# Altium PCB PCB_PowerBoard_7500-0430.PcbDoc (part 2 of 5)
Units mil, origin at the board's own origin, x right, y up, seen from the top; angles counter-clockwise.
Board outline 4000 x 3250 mil, 4 copper layers (Top Layer, Layer 1, Layer 2, Bottom Layer), stack 62.449 mil thick; 205 components, 100 nets, 1585 pads, 235 vias.
Unrouted connection lines stored in the file: 2.
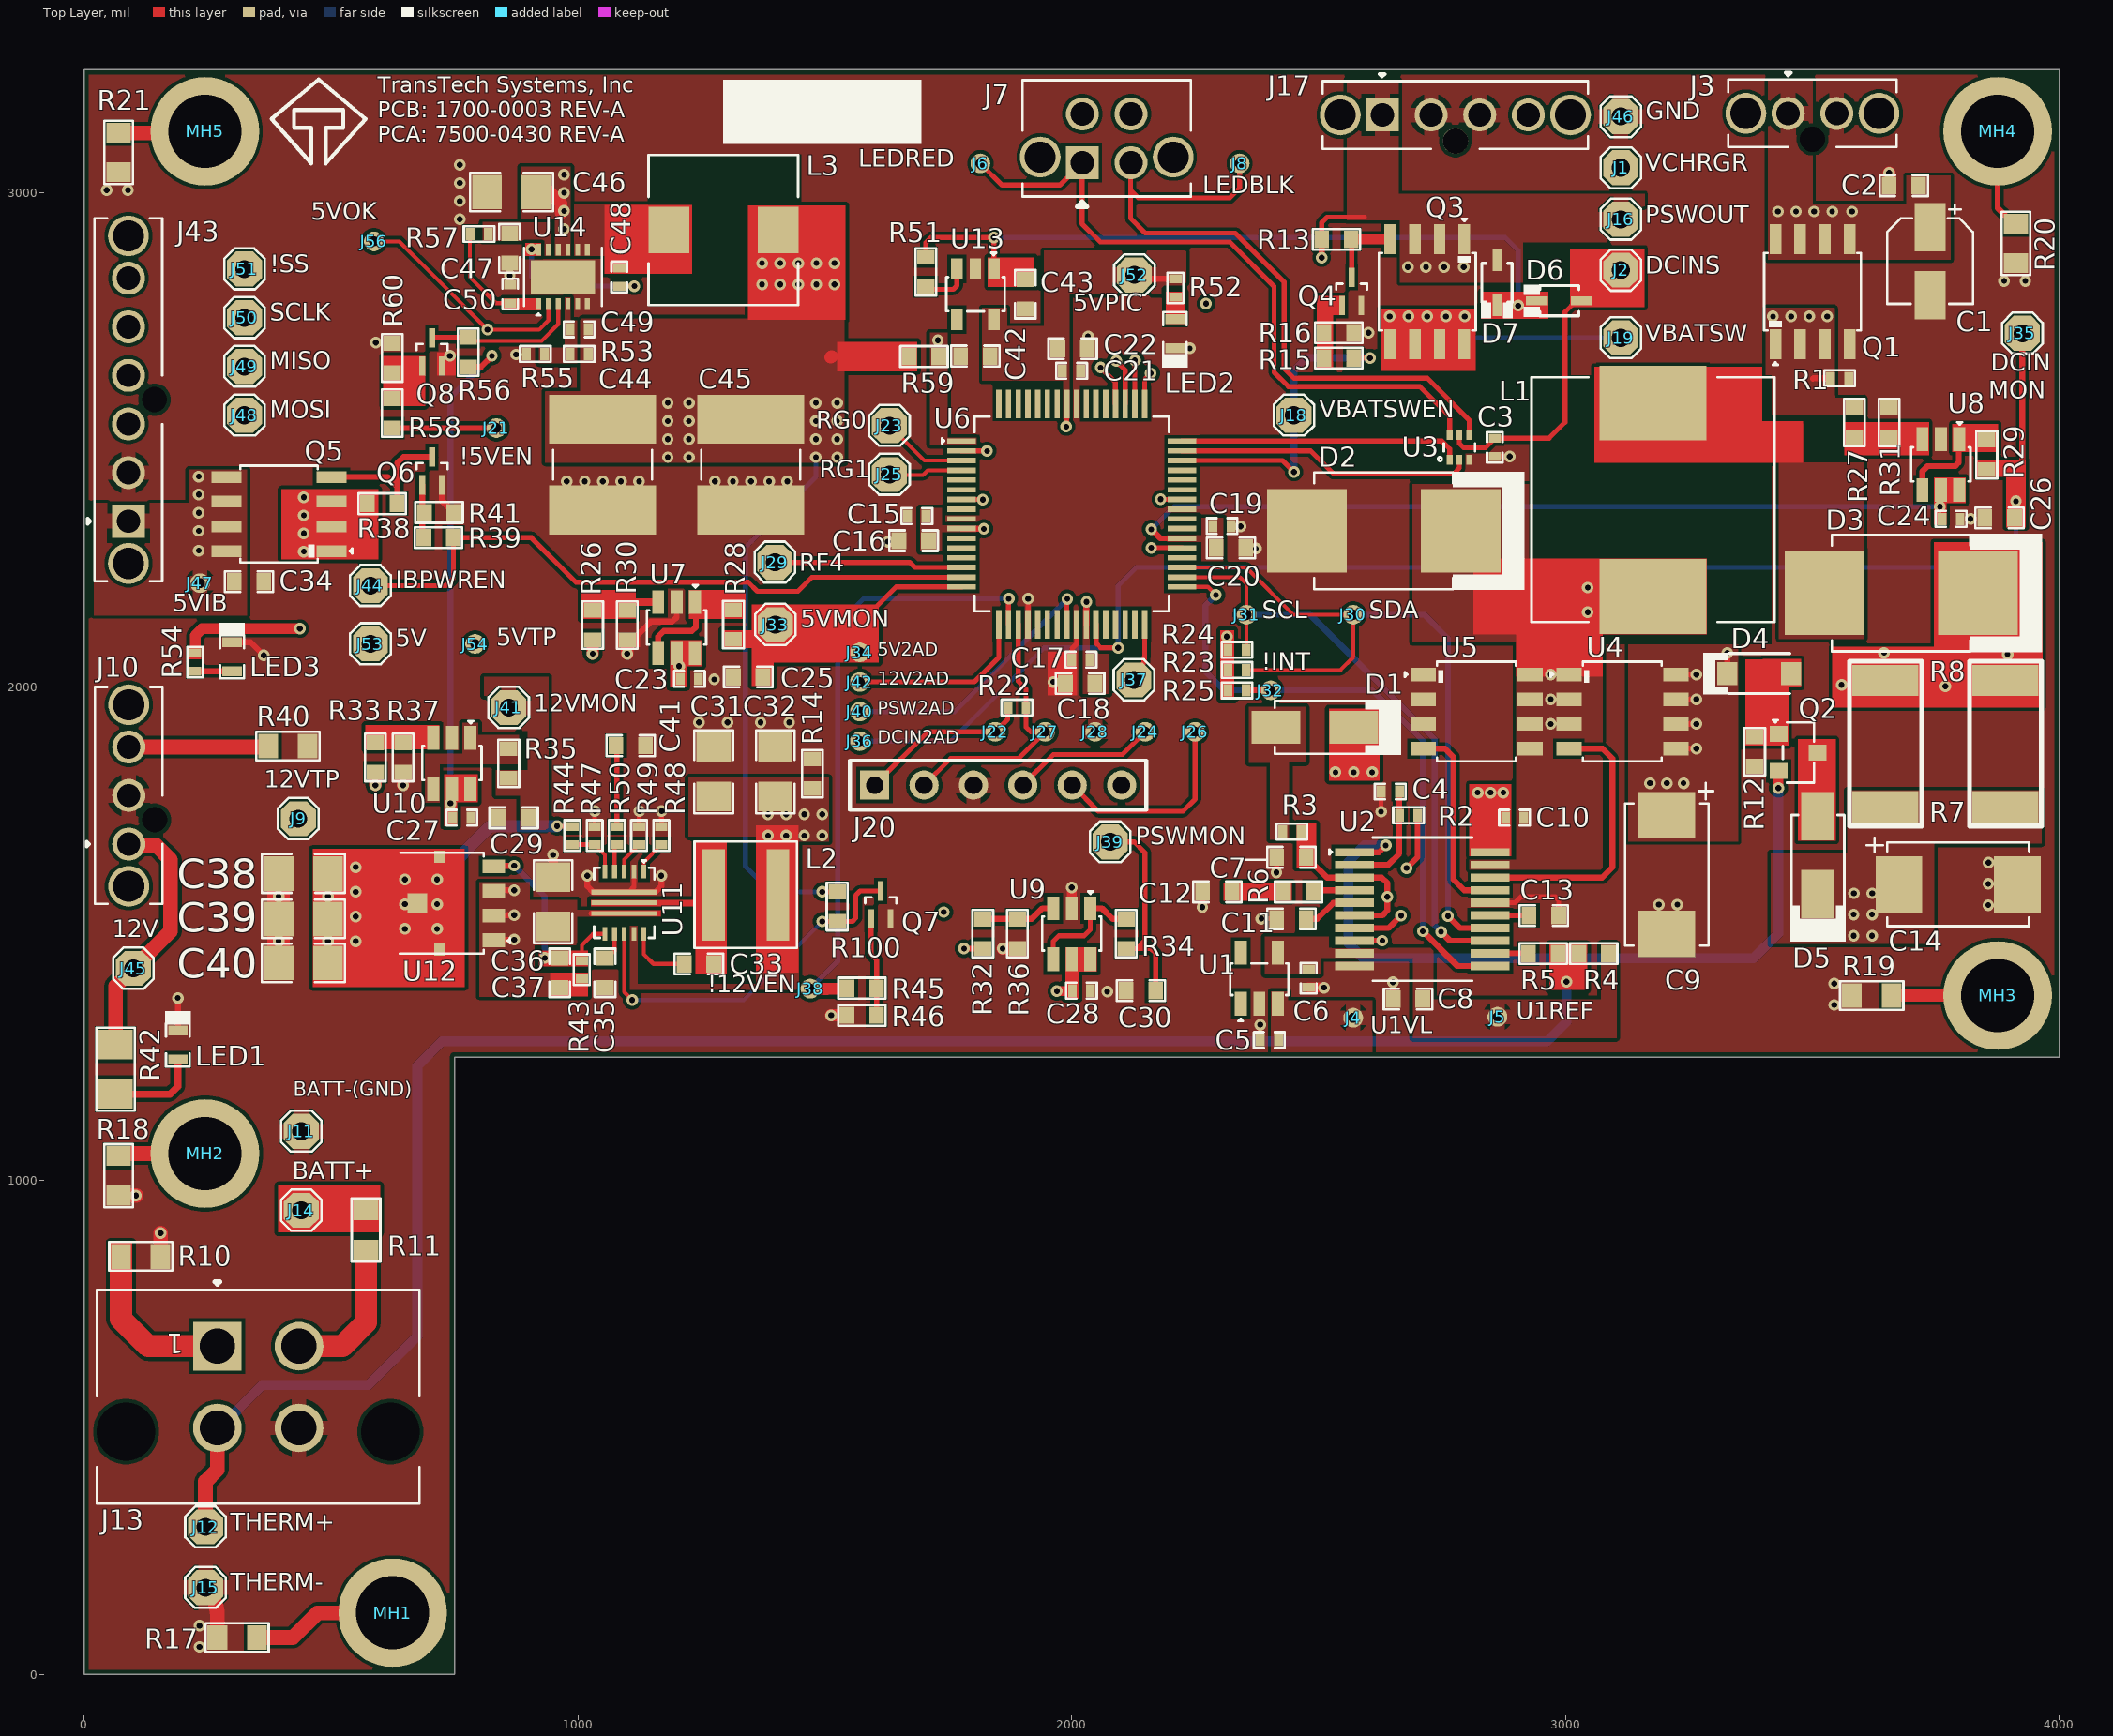
[diagram p0: Top Layer view]

## Part data (continued)
C36: library part CC1206KKX5R9BB106, "CAP CER 10UF 50V X5R 1206", Case Code (Imperial)=1206, Case Code (Metric)=3216, Dielectric=X5R, LCSC Part Number=C100122, Manufacturer=Yageo, Max Operating Temperature=85°C, Min Operating Temperature=-55°C, Supplier Part Number=2072123, Tolerance=10%, Voltage Rating=50V, Case/Package=1206, ComponentLink1Description=https://datasheet.octopart.com/CC1206KKX5R9BB106-Yageo-datasheet-170350636.pdf?src-supplier=Future+Electronics, ComponentLink1URL=https://datasheet.octopart.com/CC1206KKX5R9BB106-Yageo-datasheet-170350636.pdf?src-supplier=Future+Electronics, ComponentLink2Description=https://datasheet.octopart.com/CC1206KKX5R9BB106-Yageo-datasheet-145016144.pdf?src-supplier=Future+Electronics, ComponentLink2URL=https://datasheet.octopart.com/CC1206KKX5R9BB106-Yageo-datasheet-145016144.pdf?src-supplier=Future+Electronics, ComponentLink3Description=http://www.yageo.com/documents/recent/UPY-GPHC_X5R_4V-to-50V_25.pdf?src-supplier=Digikey, ComponentLink3URL=http://www.yageo.com/documents/recent/UPY-GPHC_X5R_4V-to-50V_25.pdf?src-supplier=Digikey, Halogen Free="Halogen Free", Height=1.9mm, Item Type=Capacitors, Lead Free="Lead Free", Length=0.126inch, Manufacturer Part Number=CC1206KKX5R9BB106, Material=4241ConductorMaterial, Mounting Technology="Surface Mount", Packaging="Cut Tape", Pricing="2000=0.0907, 6000=0.0872, 10000=0.0856, 30000=0.0823, 50000=0.0795 (USD)", RoHS=Yes, RoHS Compliant=Yes, Series=CC, Stock=220000, Supplier="Future Electronics", Thickness=0.075inch, Voltage Rating (DC)=50V, Width=0.063inch
C41: library part CS1608X7R221K500NRB, "50V 220pF X7R ±10% 0603 Multilayer Ceramic Capacitors MLCC - SMD/SMT ROHS", LCSC Part Number=C5255295, Manufacturer="Samwha Capacitors", Package=0603, ComponentLink1Description=LCSC, ComponentLink1URL=https://www.lcsc.com/product-detail/Multilayer-Ceramic-Capacitors-MLCC-SMD-SMT_Samwha-Capacitor-CS1608X7R221K500NRB_C5255295.html, Item Type=Capacitor, Manufacturer Part Number=CS1608X7R221K500NRB
C44 C45: library part CKG57NX7R1H476M500JH, "CAP CER 47UF 50V X7R 2SMD", Manufacturer=TDK, Max Operating Temperature=125°C, Min Operating Temperature=-55°C, Supplier Part Number=445-CKG57NX7R1H476M500JHCT-ND, Tolerance=20%, Voltage Rating=50V, ComponentLink1Description=https://datasheet.octopart.com/CKG57NX7R1H476M500JH-TDK-datasheet-151704564.pdf?src-supplier=Farnell, ComponentLink1URL=https://datasheet.octopart.com/CKG57NX7R1H476M500JH-TDK-datasheet-151704564.pdf?src-supplier=Farnell, Height=5.5mm, Item Type=Capacitor, Length=6mm, Manufacturer Part Number=CKG57NX7R1H476M500JH, Material=4241ConductorMaterial, Pricing="1=8.39, 10=7.269, 50=6.5232, 100=5.6659, 500=5.1254 (USD)", RoHS=No, Stock=2307, Supplier=Digikey, Width=5mm
C49: library part GJM1555C1H120GB01D, "CAP CER 12PF 50V C0G/NP0 0402", Case Code (Imperial)=0402, Case Code (Metric)=1005, Dielectric=C0G, LCSC Part Number=C161305, Manufacturer=Murata, Max Operating Temperature=125°C, Min Operating Temperature=-55°C, Package Quantity=10000, Supplier Part Number 1=490-8078-1-ND, Tolerance=2%, Voltage Rating=50V, Capacitance=12pF, Case/Package=0402, Category="Ceramic Capacitors", ComponentLink1Description=https://datasheet.ciiva.com/11608/product-11608208.pdf?src-supplier=Avnet, ComponentLink1URL=https://datasheet.ciiva.com/11608/product-11608208.pdf?src-supplier=Avnet, ComponentLink2Description=https://datasheet.ciiva.com/29542/partnumbering-e-01-29542716.pdf?src-supplier=Digi-Key, ComponentLink2URL=https://datasheet.ciiva.com/29542/partnumbering-e-01-29542716.pdf?src-supplier=Digi-Key, ComponentLink3Description=https://datasheet.ciiva.com/29542/partnumbering-e-01-29542715.pdf?src-supplier=Digi-Key, ComponentLink3URL=https://datasheet.ciiva.com/29542/partnumbering-e-01-29542715.pdf?src-supplier=Digi-Key, ComponentLink4Description=https://datasheet.ciiva.com/29542/partnumbering-e-01-29542717.pdf?src-supplier=Digi-Key, ComponentLink4URL=https://datasheet.ciiva.com/29542/partnumbering-e-01-29542717.pdf?src-supplier=Digi-Key, Construction=Flat, Depth=0.5mm, Height=0.5mm, Lead Free="Lead Free", Length=1mm, Manufacturer Part Number=GJM1555C1H120GB01D, Mount="Surface Mount", Packaging="Tape and Reel", Pricing 1="1=0.18000, 10=0.12600, 50=0.07560, 100=0.06390, 500=0.04370, 1000=0.03865, 2500=0.03698, 5000=0.03361 (USD)", Radiation Hardening=No, RoHS=Yes, RoHS Compliant=Yes, Series=GJM, Stock 1=266975, Supplier 1=Digi-Key, Termination=SMD/SMT, Thickness=0.022inch, Voltage Rating (DC)=50V, Width=0.5mm
C50: library part GRM155R71C104KA88D, ComponentLink6Description=https://datasheet.ciiva.com/14116/grmseries-highdielectrictype-eng-14116878.pdf?src-supplier=Distrelec, ComponentLink6URL=https://datasheet.ciiva.com/14116/grmseries-highdielectrictype-eng-14116878.pdf?src-supplier=Distrelec, ComponentLink7Description=https://datasheet.ciiva.com/14103/grmseries-highdielectrictype-eng-14103750.pdf?src-supplier=Distrelec, ComponentLink7URL=https://datasheet.ciiva.com/14103/grmseries-highdielectrictype-eng-14103750.pdf?src-supplier=Distrelec, ComponentLink8Description=https://datasheet.ciiva.com/28534/4360-28534127.pdf?src-supplier=Element14, ComponentLink8URL=https://datasheet.ciiva.com/28534/4360-28534127.pdf?src-supplier=Element14, ComponentLink9Description=https://datasheet.ciiva.com/28534/4360-28534133.pdf?src-supplier=Element14, ComponentLink9URL=https://datasheet.ciiva.com/28534/4360-28534133.pdf?src-supplier=Element14, ComponentLink10Description=https://datasheet.ciiva.com/16199/product-16199000.pdf?src-supplier=Future+Electronics, ComponentLink10URL=https://datasheet.ciiva.com/16199/product-16199000.pdf?src-supplier=Future+Electronics
D1 D5: "DIODE GEN PURP 50V 1A SMA", LCSC Part Number=C674398, Manufacturer=Diodes, ComponentLink1Description=https://datasheet.ciiva.com/27052/1540279-27052395.pdf?src-supplier=Jameco, ComponentLink1URL=https://datasheet.ciiva.com/27052/1540279-27052395.pdf?src-supplier=Jameco, ComponentLink2Description=https://datasheet.ciiva.com/7964/ds14001-7964264.pdf?src-supplier=Element14, ComponentLink2URL=https://datasheet.ciiva.com/7964/ds14001-7964264.pdf?src-supplier=Element14, ComponentLink3Description=https://datasheet.ciiva.com/913/ds14001-913221.pdf?src-supplier=Digikey, ComponentLink3URL=https://datasheet.ciiva.com/913/ds14001-913221.pdf?src-supplier=Digikey, ComponentLink4Description=https://datasheet.ciiva.com/913/ds14001-913222.pdf?src-supplier=Digikey, ComponentLink4URL=https://datasheet.ciiva.com/913/ds14001-913222.pdf?src-supplier=Digikey, ComponentLink5Description=https://datasheet.ciiva.com/913/ds14001-913223.pdf?src-supplier=Digikey, ComponentLink5URL=https://datasheet.ciiva.com/913/ds14001-913223.pdf?src-supplier=Digikey, ComponentLink6Description=https://datasheet.ciiva.com/15144/getdatasheetpartid-89769-15144650.pdf?src-supplier=Verical, ComponentLink6URL=https://datasheet.ciiva.com/15144/getdatasheetpartid-89769-15144650.pdf?src-supplier=Verical, Item Type=Diodes, Manufacturer Part Number=ES1A-13-F, Pricing="1=0.47, 10=0.336, 100=0.1693, 500=0.15004, 1000=0.11676, 2000=0.1045 (USD)", RoHS=Yes, Stock=130862, Supplier=Digikey
D2 D3: "DIODE SCHOTTKY 60V 5A SMC", Forward Current=5A, LCSC Part Number=C460781, Manufacturer=Diodes, Supplier Part Number 1=B560CQ-13-FDICT-ND, ComponentLink1Description=https://www.diodes.com/assets/Datasheets/B520CQ-B560CQ.pdf?src-supplier=Digikey, ComponentLink1URL=https://www.diodes.com/assets/Datasheets/B520CQ-B560CQ.pdf?src-supplier=Digikey, ComponentLink2Description=https://www.diodes.com/assets/Datasheets/B520CQ_B560CQ.pdf?src-supplier=Digikey, ComponentLink2URL=https://www.diodes.com/assets/Datasheets/B520CQ_B560CQ.pdf?src-supplier=Digikey, Item Type=Diode, Manufacturer Part Number=B560CQ-13-F, Pricing 1="1=0.6, 10=0.523, 100=0.3621, 500=0.30252, 1000=0.25747 (USD)", RoHS=Yes, Stock 1=31887, Supplier 1=Digikey
D4: "Zener Diode, 4.3V V(Z), 6.98%, 0.8W, Silicon, Unidirectional, DO-219AB", LCSC Part Number=C3738778, Manufacturer="Vishay Semiconductors", Supplier Part Number 1=20H3622, ComponentLink1Description=https://datasheet.ciiva.com/36856/1734670-36856998.pdf?src-supplier=Element14, ComponentLink1URL=https://datasheet.ciiva.com/36856/1734670-36856998.pdf?src-supplier=Element14, Item Type=Diodes, Manufacturer Part Number=BZD27C4V3P-E3-08, Pricing 1="1=0.402, 25=0.32, 100=0.165, 250=0.149, 500=0.133 (USD)", RoHS=Yes, Stock 1=3843, Supplier 1=Avnet
D6 D7: "Diode Schottky Barrier 25V 0.3A 2 SOD-323", Average Rectified Current=300mA, Case/Package=SOD, LCSC Part Number=C146358, Manufacturer=Toshiba, Max Operating Temperature=100°C, Max Repetitive Reverse Voltage (Vrrm)=25V, Max Reverse Voltage (DC)=20V, Min Operating Temperature=-40°C, Category="Rectifier Diodes", ComponentLink1Description=https://datasheet.ciiva.com/45259/dst-1ss404-tde-en-1850-45259189.pdf?src-supplier=Digikey, ComponentLink1URL=https://datasheet.ciiva.com/45259/dst-1ss404-tde-en-1850-45259189.pdf?src-supplier=Digikey, ComponentLink2Description=https://datasheet.ciiva.com/45259/dst-1ss404-tde-en-1850-45259190.pdf?src-supplier=Digikey, ComponentLink2URL=https://datasheet.ciiva.com/45259/dst-1ss404-tde-en-1850-45259190.pdf?src-supplier=Digikey, ComponentLink3Description=https://datasheet.ciiva.com/45259/dst-1ss404-tde-en-1850-45259191.pdf?src-supplier=Digikey, ComponentLink3URL=https://datasheet.ciiva.com/45259/dst-1ss404-tde-en-1850-45259191.pdf?src-supplier=Digikey, Contact Plating=Tin,Silver, Forward Current=300mA, Item Type=Diode, Manufacturer Part Number=1SS404,H3F, Mount="Surface Mount", Packaging="Cut Tape", Pricing 1="3000=0.01778, 6000=0.01748, 12000=0.01718, 18000=0.01688, 24000=0.01658 (USD)", RoHS=No, Series=-, Stock 1=36000, Supplier 1=Avnet, Supplier Part Number 1=1SS404,H3F
J3: "CONN HEADER VERT 2POS 2.5MM", Manufacturer=Molex, Supplier Part Number=538-105311-1302, Item Type=Headers, Manufacturer Part Number=1053111302, Pricing="1=1.41, 10=0.986, 50=0.986, 100=0.898, 1000=0.746, 10000=0.681 (USD)", RoHS=No, Stock=711, Supplier=Mouser
J7: "CONN HEADER VERT 4POS 2.5MM", Manufacturer=Molex, Supplier Part Number=538-105312-1304, ComponentLink1Description=https://www.molex.com/pdm_docs/sd/1053121204_sd.pdf?src-supplier=Digikey, ComponentLink1URL=https://www.molex.com/pdm_docs/sd/1053121204_sd.pdf?src-supplier=Digikey, Item Type=Header, Manufacturer Part Number=105312-1304, Pricing="1=1.24, 10=1.06, 50=1.06, 100=0.921, 1000=0.865, 10000=0.865 (USD)", RoHS=No, Stock=2910, Supplier=Mouser
J10: "CONN HEADER VERT 3POS 2.5MM", Insulation Color=Black, Manufacturer=Molex, Max Operating Temperature=105°C, Min Operating Temperature=-40°C, Supplier Part Number=538-105311-1303, Voltage Rating=250V, ComponentLink1Description=https://www.molex.com/pdm_docs/sd/1053111102_sd.pdf?src-supplier=Digikey, ComponentLink1URL=https://www.molex.com/pdm_docs/sd/1053111102_sd.pdf?src-supplier=Digikey, Connector Type=Header, Contact Finish - Mating=GOLD, Contact Material=Brass, Contact Shape=Square, Contact Type="Male Pin", Fastening Type=Latch, Insulation Material=Polymer, Item Type=Header, Manufacturer Part Number=105311-1303, Mounting Technology="Through Hole", Number of Positions=3, Number of Rows=1, Packaging=Tray, Pricing="1=1.61, 10=1.35, 50=1.35, 100=1.12, 1000=0.918, 10000=0.796 (USD)", RoHS=No, Series="Nano-Fit 105311", Stock=668, Supplier=Mouser, Termination=Solder
J13: "MINI-FIT JR LCP VERT. HDR PEGS 4", Manufacturer=Molex, Supplier Part Number=900-0462075004-ND, Item Type=Header, Manufacturer Part Number=0462075004, Pricing="4560=4.03702 (USD)", RoHS=No, Supplier=Digikey
J17: "CONN HEADER VERT 4POS 2.5MM", LCSC Part Number=C17483525, Manufacturer=Molex, Supplier Part Number 1=WM15091-ND, ComponentLink1Description=https://www.molex.com/pdm_docs/sd/1053111102_sd.pdf?src-supplier=Digikey, ComponentLink1URL=https://www.molex.com/pdm_docs/sd/1053111102_sd.pdf?src-supplier=Digikey, Item Type=Header, Manufacturer Part Number=105311-1304, Pricing 1="1=1.89, 10=1.612, 126=1.33143, 1008=1.05111, 4914=0.93198, 10080=0.91096 (USD)", RoHS=No, Stock 1=2407, Supplier 1=Digikey
J20: "Gold 250V 3A Straight Square Pins 2.5mm 6P 260℃ 6mm -40℃~+105℃ 3mm 2.54mm Plugin Black Brass 1x6P Plugin,P=2.54mm Pin Headers ROHS", LCSC Part Number=C706878, Manufacturer=XKB, Package=Plugin,P=2.54mm, ComponentLink1Description=LCSC, ComponentLink1URL=https://www.lcsc.com/product-detail/Pin-Headers_XKB-Connectivity-X6511WV-06H-C60D30_C706878.html, Item Type="Male Header", Manufacturer Part Number=X6511WV-06H-C60D30
J43: "CONN HEADER VERT 6POS 2.5MM", Manufacturer=Molex, Supplier Part Number=538-105311-1206, ComponentLink1Description=https://www.molex.com/pdm_docs/sd/1053111102_sd.pdf?src-supplier=Digikey, ComponentLink1URL=https://www.molex.com/pdm_docs/sd/1053111102_sd.pdf?src-supplier=Digikey, Item Type=Header, Manufacturer Part Number=105311-1206, Pricing="1=2.1, 10=1.48, 50=1.48, 100=1.48, 1000=1.17, 10000=1.17 (USD)", RoHS=No, Stock=291, Supplier=Mouser
L1: library part DR127-220-R, "FIXED IND 22UH 4A 39.1 MOHM SMD", LCSC Part Number=C2638525, Manufacturer="Eaton Cooper", Series Resistance=39.1mR, ComponentLink1Description=https://datasheet.ciiva.com/14667/0900766b8116a153-14667792.pdf?src-supplier=Rs, ComponentLink1URL=https://datasheet.ciiva.com/14667/0900766b8116a153-14667792.pdf?src-supplier=Rs, ComponentLink2Description=https://datasheet.ciiva.com/26858/getdatasheetpartid-250064-26858411.pdf?src-supplier=Verical, ComponentLink2URL=https://datasheet.ciiva.com/26858/getdatasheetpartid-250064-26858411.pdf?src-supplier=Verical, ComponentLink3Description=https://datasheet.ciiva.com/27053/1771712-27053548.pdf?src-supplier=Jameco, ComponentLink3URL=https://datasheet.ciiva.com/27053/1771712-27053548.pdf?src-supplier=Jameco, ComponentLink4Description=https://datasheet.ciiva.com/16433/bus-elx-ds-4315-dr-series-16433965.pdf?src-supplier=Future+Electronics, ComponentLink4URL=https://datasheet.ciiva.com/16433/bus-elx-ds-4315-dr-series-16433965.pdf?src-supplier=Future+Electronics, ComponentLink5Description=https://datasheet.ciiva.com/22771/87246-22771606.pdf?src-supplier=Farnell, ComponentLink5URL=https://datasheet.ciiva.com/22771/87246-22771606.pdf?src-supplier=Farnell, ComponentLink6Description=https://datasheet.ciiva.com/30102/43bus-elx-ds-4315-dr-ser-30102011.pdf?src-supplier=Onlinecomponents.com, ComponentLink6URL=https://datasheet.ciiva.com/30102/43bus-elx-ds-4315-dr-ser-30102011.pdf?src-supplier=Onlinecomponents.com, ComponentLink7Description=https://datasheet.ciiva.com/16940/70037876-16940553.pdf?src-supplier=Allied+Electronics, ComponentLink7URL=https://datasheet.ciiva.com/16940/70037876-16940553.pdf?src-supplier=Allied+Electronics, ComponentLink8Description=https://datasheet.ciiva.com/8004/87246-8004871.pdf?src-supplier=Element14, ComponentLink8URL=https://datasheet.ciiva.com/8004/87246-8004871.pdf?src-supplier=Element14, ComponentLink9Description=https://datasheet.ciiva.com/8005/87246-8005177.pdf?src-supplier=Element14, ComponentLink9URL=https://datasheet.ciiva.com/8005/87246-8005177.pdf?src-supplier=Element14, Item Type=Inductors, Lead Free=5697LeadFree, Manufacturer Part Number=DR127-220-R, Pricing 1="350=0.46278 (USD)", RoHS=Yes, Stock 1=13650, Supplier 1=Avnet, Supplier Part Number 1=DR127-220-R
L2: library part XAL5030-122MEC, "FIXED IND 1.2UH 10.4A 12.4MOHM", Case/Package=SMD/SMT, Inductance Tolerance=20%, Manufacturer=Coilcraft, Max DC Current=11.1A, Max Operating Temperature=125°C, Min Operating Temperature=-40°C, Saturation Current=12.5A, Self Resonant Frequency=61MHz, Supplier Part Number=994-XAL5030-122MEC, Test Frequency=100kHz, ComponentLink1Description=https://datasheet.ciiva.com/22680/1681990-22680352.pdf?src-supplier=Element14, ComponentLink1URL=https://datasheet.ciiva.com/22680/1681990-22680352.pdf?src-supplier=Element14, ComponentLink2Description=https://datasheet.ciiva.com/13277/xal50xx-13277233.pdf?src-supplier=Mouser, ComponentLink2URL=https://datasheet.ciiva.com/13277/xal50xx-13277233.pdf?src-supplier=Mouser, ComponentLink3Description=https://datasheet.ciiva.com/22760/1681990-22760013.pdf?src-supplier=Farnell, ComponentLink3URL=https://datasheet.ciiva.com/22760/1681990-22760013.pdf?src-supplier=Farnell, ComponentLink4Description=https://datasheet.ciiva.com/22701/1681990-22701564.pdf?src-supplier=Element14, ComponentLink4URL=https://datasheet.ciiva.com/22701/1681990-22701564.pdf?src-supplier=Element14, Core Material=Composite, Height=3.1mm, Item Type=Inductors, Lead Free="Contains Lead", Length=5.68mm, Manufacturer Part Number=XAL5030-122MEC, Packaging="Tape and Reel", Pricing="1=2.88, 10=2.88, 50=2.88, 100=2.88, 1000=1.31, 10000=1.31 (USD)", Reach SVHC Compliant=Unknown, RMS Current (Irms)=11.1A, RoHS=Yes, RoHS Compliant=Yes, Series=XAL5030, Shielding=Shielded, Stock=945, Supplier=Mouser, Termination=SMD/SMT, Tolerance=20%, Width=5.48mm
L3: library part DRA74-3R3-R, "FIXED IND 3.3UH 4.16A 16MOHM SMD", LCSC Part Number=C3222421, Manufacturer="Eaton Cooper", Supplier Part Number 1=283-3635-1-ND, ComponentLink1Description=https://datasheet.ciiva.com/6690/9190a0eb-f996-4faf-a4d6-7b76f954f32d-6690234.pdf?src-supplier=Digikey, ComponentLink1URL=https://datasheet.ciiva.com/6690/9190a0eb-f996-4faf-a4d6-7b76f954f32d-6690234.pdf?src-supplier=Digikey, ComponentLink2Description=https://datasheet.ciiva.com/6690/9190a0eb-f996-4faf-a4d6-7b76f954f32d-6690235.pdf?src-supplier=Digikey, ComponentLink2URL=https://datasheet.ciiva.com/6690/9190a0eb-f996-4faf-a4d6-7b76f954f32d-6690235.pdf?src-supplier=Digikey, ComponentLink3Description=https://datasheet.ciiva.com/6690/9190a0eb-f996-4faf-a4d6-7b76f954f32d-6690236.pdf?src-supplier=Digikey, ComponentLink3URL=https://datasheet.ciiva.com/6690/9190a0eb-f996-4faf-a4d6-7b76f954f32d-6690236.pdf?src-supplier=Digikey, ComponentLink4Description=https://datasheet.ciiva.com/16433/9190a0eb-f996-4faf-a4d6-7b76f954f32d-16433947.pdf?src-supplier=Future+Electronics, ComponentLink4URL=https://datasheet.ciiva.com/16433/9190a0eb-f996-4faf-a4d6-7b76f954f32d-16433947.pdf?src-supplier=Future+Electronics, Item Type=Inductors, Lead Free=5697LeadFree, Manufacturer Part Number=DRA74-3R3-R, Pricing 1="1=1.64, 10=1.385, 25=1.2588, 50=1.1834, 100=0.9819, 250=0.90636, 500=0.85602 (USD)", RoHS=Yes, Stock 1=19552, Supplier 1=Digikey
LED1 LED2 LED3: library part NCD0603G2, "Emerald 0603 Light Emitting Diodes (LED) ROHS", LCSC Part Number=C87326, Manufacturer="Foshan NationStar Optoelectronics", Package=0603, ComponentLink1Description=LCSC, ComponentLink1URL=https://www.lcsc.com/product-detail/Light-Emitting-Diodes-LED_Foshan-NationStar-Optoelectronics-NCD0603G2_C87326.html, Item Type=LED, Manufacturer Part Number=NCD0603G2
MH1 MH2 MH3 MH4 MH5: "-", Manufacturer Part Number="M4 Mounting Hole", Item Type="Mounting Hole"
Q1 Q3 Q5: "MOSFET P-CH 40V 10A 8SOIC", LCSC Part Number=C51499, Manufacturer="Alpha & Omega Semiconductor", ComponentLink1Description=https://datasheet.ciiva.com/26861/getdatasheetpartid-417133-26861485.pdf?src-supplier=Verical, ComponentLink1URL=https://datasheet.ciiva.com/26861/getdatasheetpartid-417133-26861485.pdf?src-supplier=Verical, ComponentLink2Description=https://datasheet.ciiva.com/6367/ao4485-6367585.pdf?src-supplier=Digikey, ComponentLink2URL=https://datasheet.ciiva.com/6367/ao4485-6367585.pdf?src-supplier=Digikey, Item Type=MOSFETs, Manufacturer Part Number=AO4485, Pricing="1=0.89, 10=0.768, 100=0.5318, 500=0.44432, 1000=0.37814 (USD)", RoHS=Yes, Stock=22089, Supplier=Digikey
Q2: "45V 310mW 250@100mA,1V 800mA SOT-23 Bipolar (BJT) ROHS", LCSC Part Number=C489159, Manufacturer=KEXIN, Package=SOT-23, ComponentLink1Description=LCSC, ComponentLink1URL=https://www.lcsc.com/product-detail/Bipolar-BJT_KEXIN-BC807-40_C489159.html, Item Type=(BJT), Manufacturer Part Number=BC807-40
Q4 Q6 Q7 Q8: "Small Signal Bipolar Transistor, 0.6A I(C), 40V V(BR)CEO, 1-Element, NPN, Silicon", Manufacturer="ON Semiconductor", Supplier Part Number=MMBT2222ATT3GOSCT-ND, Category=BJTs, ComponentLink1Description=https://datasheet.ciiva.com/980/mmbt2222lt1-d-980718.pdf?src-supplier=Digikey, ComponentLink1URL=https://datasheet.ciiva.com/980/mmbt2222lt1-d-980718.pdf?src-supplier=Digikey, ComponentLink2Description=https://datasheet.ciiva.com/4724/mmbt2222att1-d-81771-4724629.pdf?src-supplier=Mouser, ComponentLink2URL=https://datasheet.ciiva.com/4724/mmbt2222att1-d-81771-4724629.pdf?src-supplier=Mouser, Manufacturer Part Number=MMBT2222ATT3G, Pricing="1=0.12, 10=0.082, 100=0.0441, 500=0.03466, 1000=0.02407, 2000=0.01994, 5000=0.01885 (USD)", RoHS=Yes, Stock=7029, Supplier=Digikey
R1 R22 R23 R24 R25: library part RC0402FR-0710KL, "RES 10K OHM 1% 1/16W 0402", Case Code (Imperial)=0402, Case Code (Metric)=1005, LCSC Part Number=C60490, Manufacturer=Yageo, Max Operating Temperature=155°C, Max Power Dissipation=63mW, Min Operating Temperature=-55°C, Power Rating=62.5mW, Resistance=10kR, Resistance Tolerance=1%, Resistor Type="Thick Film", Supplier Part Number 1=603-RC0402FR-0710KL, Temperature Coefficient=100ppm/°C, Voltage Rating=50V, Case/Package=0402, Category="Chip SMD Resistors", ComponentLink1Description=https://datasheet.ciiva.com/7660/38568-7660787.pdf?src-supplier=Element14, ComponentLink1URL=https://datasheet.ciiva.com/7660/38568-7660787.pdf?src-supplier=Element14, ComponentLink2Description=https://datasheet.ciiva.com/7849/1686128-7849814.pdf?src-supplier=Element14, ComponentLink2URL=https://datasheet.ciiva.com/7849/1686128-7849814.pdf?src-supplier=Element14, ComponentLink3Description=https://datasheet.ciiva.com/7983/1018594-7983486.pdf?src-supplier=Element14, ComponentLink3URL=https://datasheet.ciiva.com/7983/1018594-7983486.pdf?src-supplier=Element14, ComponentLink4Description=https://datasheet.ciiva.com/22747/1018594-22747512.pdf?src-supplier=Element14, ComponentLink4URL=https://datasheet.ciiva.com/22747/1018594-22747512.pdf?src-supplier=Element14, ComponentLink5Description=https://datasheet.ciiva.com/12667/pyu-rc0402-51-rohs-l-6-r-12667067.pdf?src-supplier=Mouser, ComponentLink5URL=https://datasheet.ciiva.com/12667/pyu-rc0402-51-rohs-l-6-r-12667067.pdf?src-supplier=Mouser, ComponentLink6Description=https://datasheet.ciiva.com/7849/1784430-7849813.pdf?src-supplier=Element14, ComponentLink6URL=https://datasheet.ciiva.com/7849/1784430-7849813.pdf?src-supplier=Element14, ComponentLink7Description=https://datasheet.ciiva.com/7849/1784430-7849815.pdf?src-supplier=Element14, ComponentLink7URL=https://datasheet.ciiva.com/7849/1784430-7849815.pdf?src-supplier=Element14, Construction=Rectangular, Depth=0.5mm, Features="Moisture Resistant", Height=0.32mm, Item Type=Resistor, Lead Free="Lead Free", Lead Pitch=0.2mm, Length=1mm, Manufacturer Part Number=RC0402FR-0710KL, Military Standard=Not, Number of Pins=2, Number of Terminations=2, Packaging="Tape and Reel", Pricing 1="1=0.10000, 10=0.01400, 50=0.01400, 100=0.00500, 1000=0.00300, 10000=0.00200 (USD)", REACH SVHC="No SVHC", RoHS=Yes, RoHS Compliant=Yes, Series=RC, Stock 1=18648329, Supplier 1=Mouser, Termination=SMD/SMT, Tolerance=1%, Voltage Rating (DC)=50V, Width=0.5mm, Working Voltage=50V
R2 R3: library part CRCW040210R0FKEDHP, "RES SMD 10 OHM 1% 1/5W 0402", Case Code (Imperial)=0402, Case Code (Metric)=1005, LCSC Part Number=C4013850, Manufacturer="Vishay Dale", Max Operating Temperature=155°C, Max Power Dissipation=200mW, Min Operating Temperature=-55°C, Package Quantity=10000, Power Rating=125mW, Resistance Tolerance=1%, Resistor Type="Thick Film", Supplier Part Number 1=541-10.0YCT-ND, Temperature Coefficient=100ppm/°C, Voltage Rating=50V, Case/Package=0402, ComponentLink1Description=http://www.mouser.com/ds/2/427/crcwhpe3-46056.pdf?src-supplier=Mouser, ComponentLink1URL=http://www.mouser.com/ds/2/427/crcwhpe3-46056.pdf?src-supplier=Mouser, Construction=Rectangular, Contact Plating=Tin, Depth=0.5mm, Features="Automotive AEC-Q200", Height=0.3mm, Lead Free="Lead Free", Length=1mm, Manufacturer Part Number=CRCW040210R0FKEDHP, Military Standard=Not, Mount="Surface Mount", Number of Terminations=2, Packaging="Tape and Reel", Pricing 1="1=0.15, 10=0.132, 100=0.0506, 1000=0.02226, 2500=0.01923, 5000=0.0172 (USD)", Radiation Hardening=No, REACH SVHC=Unknown, Resistance=10R, RoHS Compliant=Yes, Series=CRCW-HP, Stock 1=28500, Supplier 1=Digi-Key, Technology="THICK FILM", Termination=SMD/SMT, Tolerance=1%, Voltage Rating (DC)=50V, Weight=2.3E-05oz, Width=0.5mm
R4 R5 R6 R12 R13 R16 R38 R41 R46 R51 R56 R59 R60 R100: library part RK73G1JTTD1002F, "RES 10K OHM 1% 1/10W 0603", Case Code (Imperial)=0603, Case Code (Metric)=1608, LCSC Part Number=C362180, Max Operating Temperature=125°C, Min Operating Temperature=-55°C, Power Rating=100mW, Supplier Part Number=2019-RK73G1JTTD1002FCT-ND, Temperature Coefficient=50ppm/°C, Tolerance=1%, Voltage Rating=75V, Case/Package=0603, Category="Chip SMD Resistors", ComponentLink1Description=LCSC, ComponentLink2Description=http://www.mouser.com/ds/2/219/RK73G-9863.pdf?src-supplier=Mouser, ComponentLink2URL=http://www.mouser.com/ds/2/219/RK73G-9863.pdf?src-supplier=Mouser, Construction=Rectangular, Depth=0.8mm, Item Type=Resistor, Length=1.6mm, Military Standard=Not, Packaging="Tape and Reel", Pricing="1=0.22, 10=0.118, 50=0.0812, 100=0.0699, 500=0.0513, 1000=0.04545 (USD)", RoHS=Yes, RoHS Compliant=Yes, Series=RK73G, Stock=249394, Supplier=Digi-Key, Termination=SMD/SMT
R7 R8: library part TLRP3A20CR090FTE, "Res Current Sense Metal Strip 2512 0.09 Ohm 1% 2W ±25ppm/°C Molded Emboss T/R", Manufacturer=CGS, Power Rating=2W, Supplier Part Number=1712-TLRP3A20CR090FTECT-ND, Category="Chip SMD Resistors", Manufacturer Part Number=TLRP3A20CR090FTE, Packaging=10Packaging, Pricing="1=0.57, 10=0.453, 25=0.4096, 50=0.3686, 100=0.3045, 250=0.28672, 500=0.23212, 1000=0.18775 (USD)", RoHS=No, Stock=11268, Supplier=Digikey